# Altium PCB Prototype_PCB.PcbDoc
Units mm, origin at the board's own origin, x right, y up, seen from the top; angles counter-clockwise.
Board outline 100 x 90 mm, 2 copper layers (Top Layer, Bottom Layer); 79 components, 84 nets, 319 pads, 80 vias.
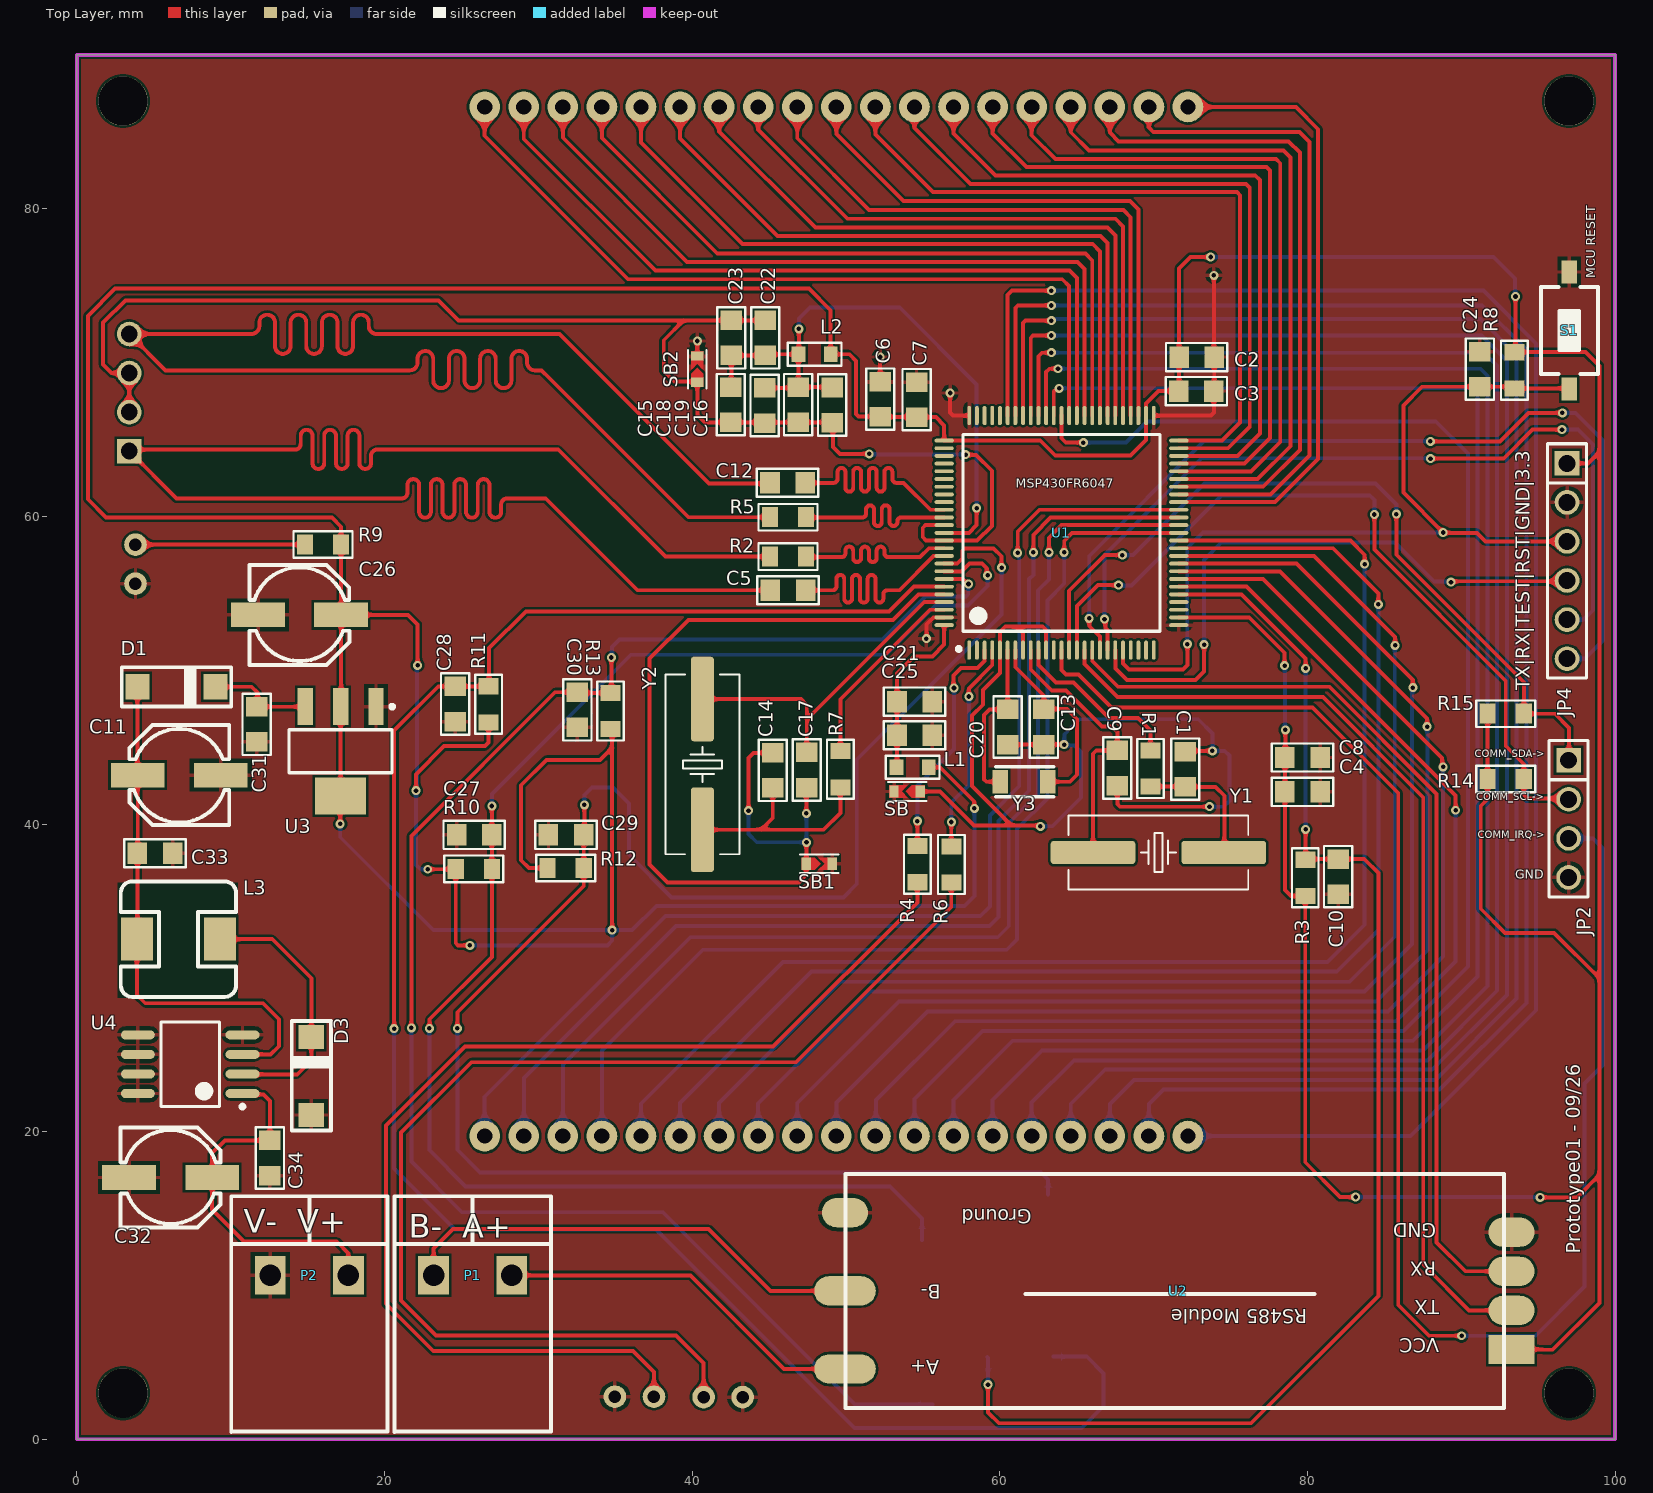
[diagram p0: Top Layer view]
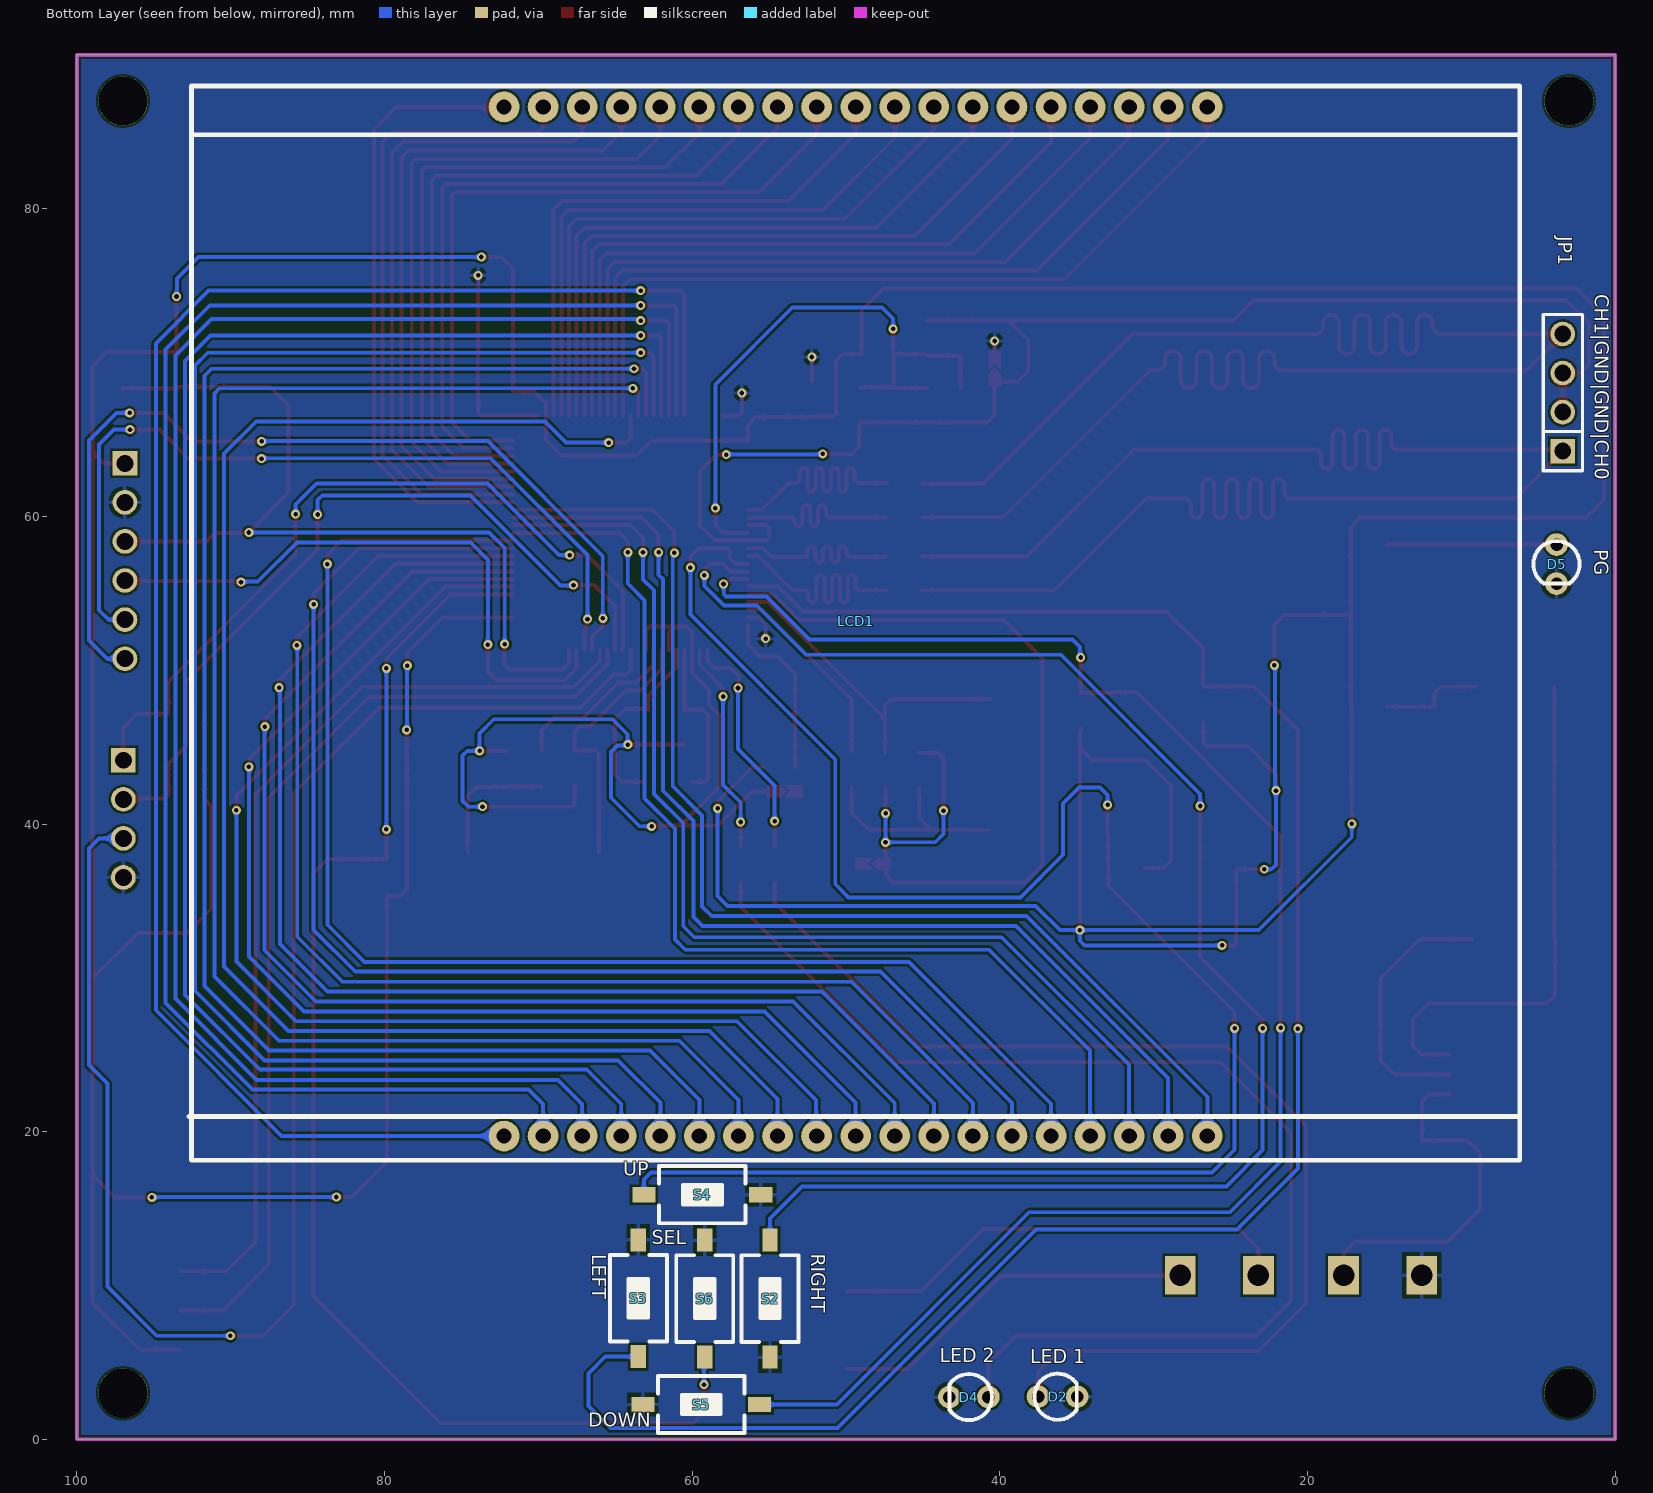
[diagram p1: Bottom Layer view, seen from below]

## Layer stack, top to bottom
Top Solder: solder mask 0.0102, Solder Resist, Dk 3.5
Top Layer: signal copper 0.0356
Dielectric 1: dielectric 0.32, FR-4, Dk 4.8
Bottom Layer: signal copper 0.0356
Bottom Solder: solder mask 0.0102, Solder Resist, Dk 3.5

## Board outline
0,0 0,90 100,90 100,0

## Design rules (kind name [scope] priority, off if disabled: settings)
Clearance [All] p1: gap=0.152 ignorepadtopadclearanceinfootprint=FALSE
MatchedLengths ch_out_2 [InNetClass('CH_OUT_2')] p1: tolerance=0.254 checknetsindiffpair=TRUE checkdiffpairvsdiffpair=FALSE checkxsignals=FALSE checkothers=FALSE
MatchedLengths ch_out [InNetClass('CH_OUT')] p2: tolerance=0.254 checknetsindiffpair=TRUE checkdiffpairvsdiffpair=FALSE checkxsignals=FALSE checkothers=FALSE
MatchedLengths ch_in [InNetClass('CH_IN')] p3: tolerance=0.254 checknetsindiffpair=TRUE checkdiffpairvsdiffpair=FALSE checkxsignals=FALSE checkothers=FALSE
PolygonConnect [All] p1: connectstyle=Relief reliefconductorwidth=0.254 reliefentries=4 polygonreliefangle="90 Angle" airgapwidth=0.254
RoutingVias [All] p1: holewidth=0.3 width=0.8 viastyle="Through Hole" minholewidth=0.3 minwidth=0.584 maxholewidth=0.5 maxwidth=1
SolderMaskExpansion [All] p1: expansion=0.102 istentingtop=FALSE
Width [All] p1: maxlimit=2.54 minlimit=0.203 preferedwidth=0.254
30 further rules are at their usual default settings.

## Components (designator, comment, footprint, x,y, rotation, side; value= is the part's Value field where it differs from the comment)
C1 "12p" SM-0805 72.06,43.561 r270 top
C2 "106" SM-0805 72.796,70.358 r0 top
C3 "106" SM-0805 72.771,68.148 r0 top
C4 "106" SM-0805 79.68,42.088 r0 top
C5 "102" SM-0805 46.228,55.194 r180 top
C6 "104" SM-0805 52.222,67.615 r270 top
C7 "104" SM-0805 54.585,67.589 r270 top
C8 "104" SM-0805 79.68,44.323 r180 top
C9 "12p" SM-0805 67.64,43.637 r90 top
C10 "104" SM-0805 81.991,36.576 r90 top
C11 "220uF/ 16V" "CAP SMD ALUMINUM D8" 6.655,43.18 r270 top
C12 "102" SM-0805 46.203,62.179 r180 top
C13 "12p" SM-0805 62.865,46.304 r90 top
C14 "12pF" SM-0805 45.237,43.485 r270 top
C15 "106" SM-0805 42.502,67.257 r270 top
C16 "106" SM-0805 49.098,67.234 r90 top
C17 "12pF" SM-0805 47.447,43.51 r90 top
C18 "106" SM-0805 44.704,67.208 r270 top
C19 "106" SM-0805 46.888,67.259 r90 top
C20 "12p" SM-0805 60.503,46.304 r90 top
C21 "106" SM-0805 54.458,47.955 r0 top
C22 "102" SM-0805 44.755,71.603 r270 top
C23 "102" SM-0805 42.545,71.603 r90 top
C24 "102" SM-0805 91.211,69.571 r270 top
C25 "104" SM-0805 54.458,45.771 r180 top
C26 "220uF/ 16V" "CAP SMD ALUMINUM D8" 14.478,53.594 r90 top
C27 "104" SM-0805 25.832,39.294 r0 top
C28 "104" SM-0805 24.587,47.803 r90 top
C29 "104" SM-0805 31.801,39.294 r0 top
C30 "104" SM-0805 32.537,47.422 r90 top
C31 "106" SM-0805 11.684,46.482 r90 top
C32 "100uF/ 35V" "CAP SMD ALUMINUM D8" 6.096,17.018 r90 top
C33 "104" SM-0805 5.08,38.1 r0 top
C34 "100nF" SM-0805 12.548,18.288 r90 top
D1 "M7" DO-214AC 6.477,48.92 r0 top
D2 "LED" "LED-3MM GRE" 36.246,2.769 r180 bottom value="LED 3 ly Single Colour"
D3 "SS210" DO-214AC 15.24,23.622 r90 top
D4 "LED" "LED-3MM GRE" 42.012,2.743 r0 bottom value="LED 3 ly Single Colour"
D5 "LED" "LED-3MM RED" 3.81,56.896 r270 bottom value="LED 3 ly Single Colour"
JP1 "JP 1x4 2.54" "JP 1x4 DT" 3.404,64.237 r90 bottom
JP2 "JP 1x4 2.54" "JP 1x4 DT" 96.977,44.145 r270 top
JP4 "JP 1x6 2.54" "JP 1x6 DT" 96.876,63.449 r270 top
L1 "600R" "WE-CBF_0805_High Speed" 54.331,43.688 r0 top value=11Ω
L2 "600R" "WE-CBF_0805_High Speed" 47.955,70.536 r180 top value=11Ω
L3 "100uH" "INDUCTOR SMD 7342 7.3X7.3X4.2mm" 6.604,32.512 r180 top value="150 mH"
LCD1 "LCD_TH1622" LCD_HT1622 49.371,45.434 r0 bottom
P1 "CON 2 EDG5.08" "CON 2 2EDG5.08" 28.27,10.668 r180 top
P2 "CON 2 EDG5.08" "CON 2 2EDG5.08" 17.653,10.668 r180 top
R1 "22R" "RESISTOR SMD 0805" 69.799,43.612 r270 top
R2 "200R" "RESISTOR SMD 0805" 46.228,57.379 r0 top
R3 "10k" "RESISTOR SMD 0805" 79.858,36.5 r270 top
R4 "1K" "RESISTOR SMD 0805" 54.635,37.389 r90 top
R5 "200R" "RESISTOR SMD 0805" 46.228,59.944 r0 top
R6 "1K" "RESISTOR SMD 0805" 56.845,37.363 r90 top
R7 "22R" "RESISTOR SMD 0805" 49.632,43.561 r270 top
R8 "47K" "RESISTOR SMD 0805" 93.447,69.494 r90 top
R9 "1k" "RESISTOR SMD 0805" 16.002,58.166 r180 top
R10 "10k" "RESISTOR SMD 0805" 25.806,37.084 r180 top
R11 "10k" "RESISTOR SMD 0805" 26.772,47.777 r270 top
R12 "10k" "RESISTOR SMD 0805" 31.775,37.135 r180 top
R13 "10k" "RESISTOR SMD 0805" 34.696,47.346 r270 top
R14 "4.7k" "RESISTOR SMD 0805" 92.888,42.926 r0 top
R15 "4.7k" "RESISTOR SMD 0805" 92.888,47.168 r0 top
S1 "SW" "BUTTON-SMD 2PIN" 97.028,72.085 r90 top
S2 "SW" "BUTTON-SMD 2PIN" 54.94,9.144 r270 bottom
S3 "SW" "BUTTON-SMD 2PIN" 63.5,9.169 r90 bottom
S4 "SW" "BUTTON-SMD 2PIN" 59.344,15.9 r180 bottom
S5 "SW" "BUTTON-SMD 2PIN" 59.411,2.261 r0 bottom
S6 "SW" "BUTTON-SMD 2PIN" 59.182,9.144 r90 bottom
SB "Bridge Line" "SB 0603" 53.924,42.113 r180 top
SB1 "Bridge Line" "SB 0603" 48.311,37.414 r0 top
SB2 "Bridge Line" "SB 0603" 40.335,69.621 r90 top
U1 "MSP430FR6047IPZR" *PZ0100A_L 64.008,58.928 r90 top
U2 "RS485 Module" "RS485_MODULE SMD" 71.323,9.627 r180 top
U3 "LM1117-3.3V" SOT223-4N 17.145,44.729 r270 top
U4 "XL1509" SOP8 7.366,24.384 r180 top
Y1 "8Mhz" "Thach Anh 2 chan SMD" 70.307,38.151 r0 top value=4Mhz
Y2 "8Mhz" "Thach Anh 2 chan SMD" 40.665,43.874 r270 top value=4Mhz
Y3 "32.768" "THACH ANH DAN 3215" 61.62,42.748 r0 top

## Footprints (in the part's own frame and the unit in brackets; to place one, negate y for a bottom-side part, rotate by r counter-clockwise, add the part's x,y. Pads: shape width x height; smd on the part's side, far side on the other; paste and mask are expansions set on the pad)
*PZ0100A_L [mm]
  oval 1.25x0.25 smd: 1(-7.625,6) 2(-7.625,5.5) 3(-7.625,5) 4(-7.625,4.5) 5(-7.625,4) 6(-7.625,3.5) 7(-7.625,3) 8(-7.625,2.5) 9(-7.625,2) 10(-7.625,1.5) 11(-7.625,1) 12(-7.625,0.5) 13(-7.625,0) 14(-7.625,-0.5) 15(-7.625,-1) 16(-7.625,-1.5) 17(-7.625,-2) 18(-7.625,-2.5) 19(-7.625,-3) 20(-7.625,-3.5) 21(-7.625,-4) 22(-7.625,-4.5) 23(-7.625,-5) 24(-7.625,-5.5) 25(-7.625,-6) 51(7.625,-6) 52(7.625,-5.5) 53(7.625,-5) 54(7.625,-4.5) 55(7.625,-4) 56(7.625,-3.5) 57(7.625,-3) 58(7.625,-2.5) 59(7.625,-2) 60(7.625,-1.5) 61(7.625,-1) 62(7.625,-0.5) 63(7.625,0) 64(7.625,0.5) 65(7.625,1) 66(7.625,1.5) 67(7.625,2) 68(7.625,2.5) 69(7.625,3) 70(7.625,3.5) 71(7.625,4) 72(7.625,4.5) 73(7.625,5) 74(7.625,5.5) 75(7.625,6)
  oval 0.25x1.25 smd: 26(-6,-7.625) 27(-5.5,-7.625) 28(-5,-7.625) 29(-4.5,-7.625) 30(-4,-7.625) 31(-3.5,-7.625) 32(-3,-7.625) 33(-2.5,-7.625) 34(-2,-7.625) 35(-1.5,-7.625) 36(-1,-7.625) 37(-0.5,-7.625) 38(0,-7.625) 39(0.5,-7.625) 40(1,-7.625) 41(1.5,-7.625) 42(2,-7.625) 43(2.5,-7.625) 44(3,-7.625) 45(3.5,-7.625) 46(4,-7.625) 47(4.5,-7.625) 48(5,-7.625) 49(5.5,-7.625) 50(6,-7.625) 76(6,7.625) 77(5.5,7.625) 78(5,7.625) 79(4.5,7.625) 80(4,7.625) 81(3.5,7.625) 82(3,7.625) 83(2.5,7.625) 84(2,7.625) 85(1.5,7.625) 86(1,7.625) 87(0.5,7.625) 88(0,7.625) 89(-0.5,7.625) 90(-1,7.625) 91(-1.5,7.625) 92(-2,7.625) 93(-2.5,7.625) 94(-3,7.625) 95(-3.5,7.625) 96(-4,7.625) 97(-4.5,7.625) 98(-5,7.625) 99(-5.5,7.625) 100(-6,7.625)
  silkscreen extent -7.67,-6.4 6.4,6.81, body extent -8,-8 8,8, height 1.6
"BUTTON-SMD 2PIN" [mm] "Switch SMD type"
  rect 1.5x1 smd: 1(-3.8,0) 2(3.8,0)
  silkscreen extent -2.82,-1.85 2.82,1.85, body extent -3.05,-1.85 3.05,1.85, height 2.5
"CAP SMD ALUMINUM D8" [mm] "SMT Aluminum Electrolytic Capacitors, Dimensions 6.3x7.7(DxL)"
  rect 1.6x3.5 smd: 1(0,-2.7) 2(0,2.7)
  silkscreen extent -3.25,-3.25 3.25,3.25, body extent -3.34,-3.52 3.26,3.48, height 7.7
"CON 2 2EDG5.08" [mm]
  rect 2x2.5 hole 1.4: 1(0,0) 2(5.08,0)
  silkscreen extent -2.54,-2.03 7.62,10.21, body extent -2.5,-1.75 7.58,10.25, height 3.15
DO-214AC [mm]
  rect 1.55x1.65 smd: 1(-2.54,0) 2(2.54,0)
  silkscreen extent -3.56,-1.27 3.56,1.27, body extent -2.59,-1.29 2.61,1.31, height 2.4
"INDUCTOR SMD 7342 7.3X7.3X4.2mm" [mm] "Inductor 7342 Body 7.3x7.3X4.2mm, Pad 2.8x2.1mm"
  rect 2.1x2.8 smd: 1(-2.7,0) 2(2.7,0)
  silkscreen extent -3.75,-3.75 3.75,3.75, body extent -3.65,-3.65 3.65,3.65, height 4.8
"JP 1x4 DT" [mm] "4 pins, 1 row, straight, gold plating"
  rect 1.6x1.6 hole 1.1: 1(0,0)
  round 1.6 hole 1.1: 2(2.54,0) 3(5.08,0) 4(7.62,0)
  silkscreen extent -1.27,-1.27 8.89,1.27, body extent -1.27,-1.27 8.89,1.27, height 8.54
"JP 1x6 DT" [mm] "6 pins, 1 row, straight, gold plating"
  rect 1.6x1.6 hole 1.1: 1(0,0)
  round 1.6 hole 1.1: 2(2.54,0) 3(5.08,0) 4(7.62,0) 5(10.16,0) 6(12.7,0)
  silkscreen extent -1.27,-1.27 13.97,1.27, body extent -1.27,-1.27 13.97,1.27, height 8.54
LCD_HT1622 [mm] "LCD_HT1622"
  round 2 hole 1: 1(-22.86,-41.18) 2(-20.32,-41.18) 3(-17.78,-41.18) 4(-15.24,-41.18) 5(-12.7,-41.18) 6(-10.16,-41.18) 7(-7.62,-41.18) 8(-5.08,-41.18) 9(-2.54,-41.18) 10(0,-41.18) 11(2.54,-41.18) 12(5.08,-41.18) 13(7.62,-41.18) 14(10.16,-41.18) 15(12.7,-41.18) 16(15.24,-41.18) 17(17.78,-41.18) 18(20.32,-41.18) 19(22.86,-41.18) 20(-22.86,25.718) 21(-20.32,25.718) 22(-17.78,25.718) 23(-15.24,25.718) 24(-12.7,25.718) 25(-10.16,25.718) 26(-7.62,25.718) 27(-5.08,25.718) 28(-2.54,25.718) 29(0,25.718) 30(2.54,25.718) 31(5.08,25.718) 32(7.62,25.718) 33(10.16,25.718) 34(12.7,25.718) 35(15.24,25.718) 36(17.78,25.718) 37(20.32,25.718) 38(22.86,25.718)
  silkscreen extent -43.18,-42.55 43.34,27.31
"LED-3MM GRE" [mm]
  round 1.47 hole 0.813: 1(-1.27,0) 2(1.27,0)
  silkscreen extent -1.5,-1.5 1.25,1.5, body extent -1.73,-1.65 1.49,1.65, height 4.72
"LED-3MM RED" [mm]
  round 1.47 hole 0.813: 1(-1.27,0) 2(1.27,0)
  silkscreen extent -1.5,-1.5 1.25,1.5, body extent -1.71,-1.65 1.5,1.65, height 4.72
"RESISTOR SMD 0805" [mm]
  rect 1.05x1.3 smd: 1(-1.177,0) 2(1.177,0)
  Top Layer pour cut-out: -0.584,0.864 0.584,0.864 0.584,-0.864 -0.584,-0.864
  silkscreen extent -1.92,-0.86 1.92,0.86, body extent -1,-0.62 1,0.63, height 0.5
"RS485_MODULE SMD" [mil]
  rect 118.11x75 smd: 1(-864,149)
  oval 118.11x75 smd: 2(-864,49) 3(-864,-51) 4(-864,-151) 5(842,-201)
  oval 157.48x75 smd: 6(842,-1) 7(842,199)
  silkscreen extent -845,-300 841,298
"SB 0603" [mm]
  rect 0.6x0.8 smd: 1(-0.9,0) 2(0.8,0)
  Top Layer region: 1.1,0.4 -0.1,0.4 0.3,0 -0.1,-0.4 1.1,-0.4
  Top Layer region: -1.2,0.4 -0.35,0.4 0.05,0 -0.35,-0.4 -1.2,-0.4
  silkscreen extent -1.3,-0.61 1.19,0.61
SM-0805 [mil] "Compoment SMD 80x50mil"
  rect 50x55 smd: 1(-45,0) 2(45,0)
  Top Layer pour cut-out: -18,36 18,36 18,-36 -18,-36
  silkscreen extent -78,-36 78,36, body extent -40,-25 40,25, height 24
SOP8 [mm] "8-Pin Small Outline Package 1.27 mm Pitch, IPC Medium Density"
  oval 2.2x0.6 smd: 1(-3.4,1.905) 2(-3.4,0.635) 3(-3.4,-0.635) 4(-3.4,-1.905) 5(3.4,-1.905) 6(3.4,-0.635) 7(3.4,0.635) 8(3.4,1.905)
  silkscreen extent -3.52,-2.75 1.9,2.88, body extent -3.02,-2.51 3.02,2.51, height 1.6
SOT223-4N [mm] "SOT223, 4-Leads, Body 6.5x3.5mm, Pitch 2.3mm, Lead Span 7mm, IPC Medium Density"
  rect 2.4x1 smd: 1(-2.9,2.3) 2(-2.9,0) 3(-2.9,-2.3)
  rect 2.4x3.3 smd: 4(2.9,0)
  silkscreen extent -3.02,-3.35 1.4,3.48, body extent -3.39,-3.27 3.5,3.23, height 1.72
"Thach Anh 2 chan SMD" [mm] "SMD Crystal HC49/US-SM package"
  round 0.508 on Mech15: 0(0,0)
  rrect25% 5.5x1.5 smd: 1(-4.25,0) 2(4.25,0)
  silkscreen extent -5.84,-2.41 5.84,2.41, body extent -6.4,-2.41 6.4,2.42, height 4.29
"THACH ANH DAN 3215" [mm] "Thach Anh Dan 5.08mm"
  rect 1x1.5 smd: 1(-1.6,0) 2(1.5,0)
  silkscreen extent -1.9,-0.98 1.9,0.97, body extent -1.6,-0.75 1.6,0.75, height 0.8
"WE-CBF_0805_High Speed" [mm] "SMD EMI Suppression Ferrite  Bead, body 2.0mmx1.2mm"
  rect 0.9x1 smd: 1(-1.05,0) 2(1.05,0)
  silkscreen extent -1.75,-0.75 1.75,0.75, body extent -1,-0.6 1,0.6, height 0.93

## Part data
C1 C2 C3 C4 C5 C6 C7 C8 C9 C10 C12 C13 C14 C15 C16 C17 C18 C19 C20 C21 C22 C23 C24 C25 C27 C28 C29 C30 C31 C33 C34: library part Cap_Non-Polar
C11 C26 C32: library part Cap_Polar
D1: library part "Diode Standard", "Diode Standard", Part Number="LED 3 ly Single Colour"
D2 D4 D5: "LED Single"
D3: library part "Diode Schottky", "Diode Schottky", Part Number="LED 3 ly Single Colour"
JP1 JP2: library part "JP 1x4 2.54 Duc Thang", "Cắm", Chung_Loai=Cắm, Don_Vi=Con, Ma_Hang=MH000903, Ten_Linh_Kien="Jump Đơn Đực 2.54MM 1x40P Thẳng 11MM"
JP4: library part "JP 1x6 2.54 Duc Thang", "Cắm", Chung_Loai=Cắm, Don_Vi=Con, Ma_Hang=MH000903, Ten_Linh_Kien="Jump Đơn Đực 2.54MM 1x40P Thẳng 11MM"
L1 L2: library part "FERRITE BEAD", "WE-CBF SMD EMI Suppression Ferrite Bead, 0805, 11Ω", PartNumber=7427920, ComponentLink1Description=Manufacturer, ComponentLink1URL=http://www.we-online.de, ComponentLink2Description=Datasheet, ComponentLink2URL=http://katalog.we-online.de/pbs/datasheet/7427920.pdf, PublishedDate="Aug 2016", Publisher="Wurth Elektronik", Size=0805, Type="High Speed"
L3: library part "Inductor Iron", "Magnetic-Core Inductor"
LCD1: library part LCD_TH_1622, "segment"
P1 P2: "Cắm", Chung_Loai=Cắm, Don_Vi=Con, Ma_Hang=MH000759, Ten_Linh_Kien="CON 2 2EDG5.08-2P 5.08MM ( Xanh Cong)"
R1 R2 R3 R4 R5 R6 R7 R8 R9 R10 R11 R12 R13 R14 R15: library part Resistor
S1 S2 S3 S4 S5 S6: library part SW-Button, "Switch-Button", LatestRevisionDate=17-Jul-2002, LatestRevisionNote="Re-released for DXP Platform.", PackageReference=SPST-2, Published=24-Mar-1999, Publisher="Altium Limited"
SB SB1 SB2: "Bridge Line connect"
U1: "Mixed-Signal Microcontroller, PZ0100A (LQFP-100)", Alternate Manufacturer="Texas Instruments", Alternate PartNumber=MSP430FR6047IPZ, ComponentLink1Description="Datasheet Link", ComponentLink1URL=https://sps06.itg.ti.com/sites/KMS/crossdivteams/altium/docs/ComponentDatasheets/SLASEB7_MSP430FR6047_Int.pdf, CompType=IC, LatestRevisionDate=2016-11-30, Manufacturer="Texas Instruments", MountType=SMT, PackageDescription=LQFP-100, PackageReference=PZ0100A, PartNumber=MSP430FR6047IPZR, Publisher="Texas Instruments", SizeArea_mm2=256, SizeAreaWB_mm2=324, SizeX_mm=16, SizeY_mm=16, SizeZ_mm=1.6, SymbolCreator=Altium, SymbolVersion=2016-11-29, U/M=EA
U2: library part "RS484 Module", "Module"
U3: library part LM1117, "800mA Low-Dropout Linear Regulator", Creator="Nguyen Ba Bien", Website=http://group3i.net
U4: "IC power sop8"
Y1 Y2: library part "Thach Anh 2 chan SMD", "Crystal For all Crystal 2pin."
Y3: library part "Thach Anh SMD 3225", "C700805", Chung_Loai=Dán, Don_Vi=Con, Ma_Hang=MH001979, Ten_Linh_Kien="Thạch Anh 16Mhz SMD5032"

## Free pads (board coordinates)
  round 3.2 hole 3.2: 2(3,3) 2(3,87) 2(97,3) 2(97,87)

## Via types
v1: diameter 0.584, hole 0.3, Top Layer to Bottom Layer, 80 vias

## Nets (pads, with @x,y where several pads share a name; then routed paths per layer and width w, separated by ;. In a path a pad name is that pad's centre, name@x,y a point inside that pad or via, vN(x,y) a via of type N, cw(c..) or ccw(c..) an arc to the next point about the centre after c; other vN are vias at no path point)
+5V: C11.1 C33.1 D1.1 L3.2 U4.3 | length 34.3
  Top Layer w0.254: D1.1 3.937,43.198 C11.1 3.955,38.118 C33.1 3.937,32.545 L3.2 3.904,28.887 4.445,28.346 12.09,28.346 13.132,27.305 13.132,25.552 12.598,25.019 U4.3
A+: P1.1 U2.7 | length 24.2
  Top Layer w0.254: P1.1 28.278,10.66 39.886,10.66 45.974,4.572 U2.7
AVCC1: C21.1 C25.2 L1.1 U1.100 | length 11.2
  Top Layer w0.254: L1.1 53.315,43.722 C25.2 C21.1 53.315,49.784 54.432,50.902 55.626,50.902 56.383,51.659 U1.100
B-: P1.2 U2.6 | length 30.7
  Top Layer w0.254: P1.2 23.19,12.395 24.46,13.665 41.072,13.665 45.085,9.652 U2.6
BTN_DWN: C30.2 R13.1 S5.1 U1.94 | length 108.4
  Top Layer w0.254: v1(21.742,26.746) 21.742,39.218 31.09,48.565 C30.2 32.579,48.523 R13.1 34.747,48.574 v1(34.747,50.825) ; U1.94 57.546,55.928 57.874,55.601 v1(57.963,55.601)
  Bottom Layer w0.254: v1(21.742,26.746) 21.742,18.059 25.044,14.757 38.1,14.757 50.597,2.261 S5.1 ; v1(34.747,50.825) 34.785,50.863 34.785,51.498 35.281,51.994 52.375,51.994 55.169,54.788 57.801,54.788 57.95,54.937 57.95,55.588 v1(57.963,55.601)
BTN_LEFT: C28.2 R11.1 S3.1 U1.95 | length 129.1
  Top Layer w0.254: v1(20.625,26.695) 20.625,46.076 23.495,48.946 C28.2 26.763,48.946 R11.1 ; R11.1@26.797,48.955 26.797,51.435 29.185,53.823 52.807,53.823 54.414,55.43 56.381,55.43 U1.95
  Bottom Layer w0.254: v1(20.625,26.695) 20.625,17.596 24.581,13.64 37.637,13.64 50.54,0.737 65.329,0.737 66.751,2.159 66.751,4.267 65.649,5.369 S3.1
BTN_RIGHT: C27.2 R10.1 S2.1 U1.93 | length 102.3
  Top Layer w0.254: v1(22.911,26.721) 22.936,26.746 22.936,27.305 26.984,31.353 R10.1 26.975,37.093 C27.2 v1(26.975,41.173) ; U1.93 57.52,56.428 58.039,56.947 58.852,56.947 59.144,56.654 59.144,56.223 v1(59.207,56.159)
  Bottom Layer w0.254: v1(22.911,26.721) 22.911,18.796 25.273,16.434 52.857,16.434 54.94,14.351 S2.1 ; v1(26.975,41.173) 26.975,41.961 36.017,51.003 52.603,51.003 55.804,54.204 57.937,54.204 59.207,55.474 v1(59.207,56.159)
BTN_SEL: C10.2 R3.1 S6.1 U1.30 | length 88.4
  Top Layer w0.254: v1(59.233,3.556) 59.233,1.753 59.944,1.041 76.327,1.041 84.607,9.322 84.607,36.805 83.693,37.719 C10.2 79.899,37.719 R3.1@79.883,37.703 ; U1.30 75.721,54.928 79.883,50.766 v1(79.883,50.114) ; R3.1 R3.1@79.883,37.703 ; v1(79.883,39.649) R3.1@79.883,37.703
  Bottom Layer w0.254: S6.1 59.233,5.293 v1(59.233,3.556) ; v1(79.883,39.649) v1(79.883,50.114)
BTN_UP: C29.2 R12.1 S4.1 U1.92 | length 119.7
  Top Layer w0.254: v1(24.74,26.721) 24.74,27.762 32.953,35.975 R12.1 32.953,39.285 32.995,39.327 v1(32.995,41.25) ; U1.92 56.385,56.93 57.235,56.93 57.556,57.252 57.556,57.763 57.705,57.912 59.588,57.912 60.096,57.404 60.096,56.693 v1(60.122,56.667)
  Bottom Layer w0.254: v1(24.74,26.721) 24.74,18.821 26.213,17.348 62.687,17.348 63.144,16.891 S4.1 ; v1(32.995,41.25) 32.995,41.885 33.477,42.367 34.849,42.367 35.89,41.326 35.89,37.998 38.659,35.23 49.835,35.23 50.698,36.093 50.698,44.196 60.122,53.619 v1(60.122,56.667)
CH0_IN: C5.1 U1.91 | length 19.2
  Top Layer w0.254: C5.1 48.997,55.194 49.124,55.194 ccw(c49.124,55.448) 49.378,55.448 49.378,55.939 cw(c49.632,55.939) 49.886,55.939 49.886,54.649 ccw(c50.14,54.649) 50.394,54.649 50.394,55.939 cw(c50.648,55.939) 50.902,55.939 50.902,54.649 ccw(c51.156,54.649) 51.41,54.649 51.41,55.939 cw(c51.664,55.939) 51.918,55.939 51.918,54.649 ccw(c52.172,54.649) 52.426,54.649 52.426,54.94 cw(c52.68,54.94) 52.68,55.194 53.465,55.194 53.467,55.194 55.701,57.428 U1.91
CH0_OUT: R2.2 U1.90 | length 13.3
  Top Layer w0.254: R2.2 47.431,57.353 49.581,57.353 49.708,57.353 ccw(c49.708,57.607) 49.962,57.607 49.962,57.776 cw(c50.216,57.776) 50.47,57.776 50.47,57.286 ccw(c50.724,57.286) 50.978,57.286 50.978,57.776 cw(c51.232,57.776) 51.486,57.776 51.486,57.286 ccw(c51.74,57.286) 51.994,57.286 51.994,57.776 cw(c52.248,57.776) 52.502,57.776 52.502,57.607 ccw(c52.756,57.607) 52.756,57.353 54.035,57.353 54.813,57.353 55.388,57.928 U1.90
CH1_IN: C12.1 U1.85 | length 19.2
  Top Layer w0.254: C12.1 49.073,62.179 49.2,62.179 ccw(c49.2,62.433) 49.454,62.433 49.454,62.893 cw(c49.708,62.893) 49.962,62.893 49.962,61.858 ccw(c50.216,61.858) 50.47,61.858 50.47,62.893 cw(c50.724,62.893) 50.978,62.893 50.978,61.858 ccw(c51.232,61.858) 51.486,61.858 51.486,62.893 cw(c51.74,62.893) 51.994,62.893 51.994,61.858 ccw(c52.248,61.858) 52.502,61.858 52.502,62.893 cw(c52.756,62.893) 53.01,62.893 53.01,62.433 ccw(c53.264,62.433) 53.264,62.179 53.674,62.179 53.746,62.179 55.499,60.427 56.382,60.427 U1.85
CH1_OUT: R5.2 U1.86 | length 13.3
  Top Layer w0.254: R5.2 47.421,59.928 50.927,59.928 51.054,59.928 ccw(c51.054,60.182) 51.308,60.182 51.308,60.461 cw(c51.562,60.461) 51.816,60.461 51.816,59.629 ccw(c52.07,59.629) 52.324,59.629 52.324,60.461 cw(c52.578,60.461) 52.832,60.461 52.832,59.629 ccw(c53.086,59.629) 53.34,59.629 53.34,59.674 cw(c53.594,59.674) 53.594,59.928 54.166,59.928 U1.86
COMM_IRQ: JP2.3 U1.13 | length 105.5
  Top Layer w0.254: U1.13 64.008,50.013 64.313,49.708 65.126,49.708 67.259,47.574 80.34,47.574 85.903,42.012 85.903,8.738 87.909,6.731 v1(90.018,6.731)
  Bottom Layer w0.254: v1(90.018,6.731) 94.818,6.731 98.019,9.931 98.019,23.127 99.212,24.321 99.212,38.405 98.552,39.065 JP2.3
COMM_SCL: JP2.2 R14.2 U1.15 | length 51.6
  Top Layer w0.254: U1.15 65.008,54.162 66.37,55.524 v1(67.716,55.524) ; v1(84.353,60.122) 84.353,57.836 92.888,49.301 92.888,45.06 94.065,43.882 R14.2 94.065,41.876 94.285,41.656 96.926,41.656 JP2.2
  Bottom Layer w0.254: v1(67.716,55.524) 67.742,55.499 68.555,55.499 74.422,61.366 84.049,61.366 84.353,61.062 v1(84.353,60.122)
COMM_SDA: JP2.1 R15.2 U1.14 | length 51.1
  Top Layer w0.254: U1.14 64.508,55.161 66.827,57.48 v1(67.97,57.48) ; v1(85.776,60.147) 85.776,57.506 94.065,49.216 R15.2 96.088,47.168 97.003,46.253 97.003,44.171 JP2.1
  Bottom Layer w0.254: v1(67.97,57.48) 68.656,57.48 73.304,62.128 84.43,62.128 85.776,60.782 v1(85.776,60.147)
DVCC1: C2.1 C3.1 C4.1 C6.2 C7.2 C8.2 C26.1 JP4.1 L1.2 L2.1 R3.2 R8.2 R9.1 R10.2 R11.2 R12.2 R13.2 R14.1 R15.1 U1.27 U1.52 U1.76 U2.1 U3.2 U3.4 | length 458.8
  Top Layer w0.254: v1(17.12,40.005) 17.12,41.804 U3.4 U3.2 17.178,47.662 C26.1 ; v1(22.047,42.164) 22.047,43.231 23.876,45.06 26.543,45.06 26.772,45.288 R11.2 ; v1(22.149,50.317) 22.149,52.959 21.514,53.594 C26.1 ; v1(22.809,37.059) 24.604,37.059 R10.2 24.629,32.254 24.778,32.106 v1(25.552,32.106) ; R12.2 29.388,37.135 28.88,37.643 28.88,42.52 30.531,44.171 34.011,44.171 34.798,44.958 ; R13.2 34.798,46.067 34.798,44.958 ; v1(34.798,33.096) 34.798,44.958 ; L1.2 56.109,43.688 58.338,41.459 58.338,41.027 v1(58.344,41.021) ; U1.27 76.214,53.428 78.507,51.135 78.507,50.296 v1(78.511,50.292) ; v1(73.711,76.86) 72.39,76.86 71.653,76.124 C2.1 71.653,68.174 C3.1 70.307,68.148 69.508,67.349 U1.52 69.508,64.961 68.504,63.957 63.602,63.957 62.631,64.928 U1.76 56.383,65.918 55.855,66.446 C7.2 54.559,66.472 C6.2 52.197,66.497 50.8,66.497 50.648,66.65 50.648,70.104 50.216,70.536 L2.1 49.005,73.397 47.6,74.803 2.489,74.803 0.711,73.025 0.711,61.112 1.905,59.919 16.586,59.919 17.179,59.325 R9.1 17.179,53.595 C26.1 ; v1(78.562,46.126) 78.562,44.348 C8.2 C4.1 78.537,35.712 78.927,35.322 R3.2 79.858,18.009 82.118,15.748 82.922,15.748 82.933,15.737 83.123,15.737 v1(83.134,15.748) ; R15.1 R14.1 91.71,41.622 91.262,41.173 91.262,34.493 92.837,32.918 96.037,32.918 98.984,29.972 ; U2.1 95.28,5.842 95.302,5.82 95.939,5.82 98.984,8.865 98.984,17.196 ; v1(93.523,74.295) 93.523,70.748 R8.2 98.086,70.672 98.984,69.774 98.984,64.186 ; v1(95.123,15.723) 97.511,15.723 98.984,17.196 ; JP4.1 98.247,63.449 98.984,64.186 ; 98.984,17.196 98.984,29.972 ; 98.984,29.972 98.984,64.186
  Bottom Layer w0.254: v1(17.12,40.005) 17.12,39.141 23.165,33.096 v1(34.798,33.096) ; v1(22.149,50.317) 22.098,50.267 22.098,42.215 v1(22.047,42.164) 22.047,37.338 22.327,37.059 v1(22.809,37.059) ; v1(25.552,32.106) 34.493,32.106 34.798,32.41 v1(34.798,33.096) ; v1(58.344,41.021) 58.344,35.306 57.709,34.671 37.668,34.671 36.093,33.096 v1(34.798,33.096) ; v1(73.711,76.86) 92.1,76.86 93.497,75.463 93.497,74.32 v1(93.523,74.295) ; v1(78.511,50.292) 78.537,50.267 78.537,46.152 v1(78.562,46.126) ; v1(83.134,15.748) 95.098,15.748 v1(95.123,15.723)
HFXIN: C9.2 U1.9 Y1.1 | length 17.9
  Top Layer w0.254: U1.9 62.008,50.031 63.373,48.666 64.313,48.666 66.65,46.33 67.285,46.33 67.64,45.974 C9.2 66.269,44.78 66.057,44.569 Y1.1
HFXOUT: R1.1 U1.10 | length 11.3
  Top Layer w0.254: U1.10 62.508,50.344 63.652,49.2 64.795,49.2 67.107,46.888 68.986,46.888 69.799,46.076 R1.1
JTAG_RST: C24.2 JP4.3 R8.1 S1.1 U1.21 | length 59
  Top Layer w0.254: U1.21 68.008,50.432 68.402,50.038 71.907,50.038 72.2,50.33 72.2,51.676 v1(72.187,51.689) ; JP4.3 91.567,58.369 91.008,58.928 88.849,58.928 v1(88.824,58.953) 86.233,61.544 86.233,67.208 87.452,68.428 C24.2 93.336,68.428 R8.1 96.996,68.317 S1.1
  Bottom Layer w0.254: v1(72.187,51.689) 72.187,57.937 73.203,58.953 v1(88.824,58.953)
JTAG_RX: JP4.5 U1.19 | length 54.5
  Top Layer w0.254: v1(66.802,53.315) 66.865,53.251 66.865,52.743 67.008,52.601 U1.19 ; v1(88.001,63.754) 92.761,63.754 94.64,65.634 v1(96.545,65.634)
  Bottom Layer w0.254: v1(66.802,53.315) 66.802,57.48 73.101,63.779 87.975,63.779 v1(88.001,63.754) ; v1(96.545,65.634) 97.587,65.634 98.552,64.668 98.552,53.899 97.942,53.289 JP4.5
JTAG_TEST: JP4.4 U1.20 | length 39.9
  Top Layer w0.254: U1.20 67.508,50.119 68.275,49.352 72.72,49.352 73.279,49.911 v1(73.279,51.664) ; v1@89.319,55.778 96.825,55.778 JP4.4
  Bottom Layer w0.254: v1(73.279,51.664) 73.279,57.175 74.397,58.293 85.7,58.293 88.24,55.753 89.306,55.753 v1(89.332,55.728)
JTAG_TX: JP4.6 U1.18 | length 60.3
  Top Layer w0.254: v1(65.811,53.365) 65.811,52.883 66.508,52.186 U1.18 ; v1(87.986,64.872) 92.507,64.872 94.361,66.726 v1(96.571,66.726)
  Bottom Layer w0.254: v1(65.811,53.365) 65.811,57.429 73.279,64.897 87.96,64.897 v1(87.986,64.872) ; v1(96.571,66.726) 97.434,66.726 99.217,64.944 99.217,51.922 98.044,50.749 JP4.6
LCD0: LCD1.1 U1.62 | length 52.3
  Top Layer w0.254: LCD1.1 26.511,84.741 35.839,75.413 64.059,75.413 64.508,74.963 U1.62
LCD1: LCD1.2 U1.61 | length 50.7
  Top Layer w0.254: LCD1.2 29.051,84.538 37.617,75.971 64.541,75.971 65.008,75.505 U1.61
LCD2: LCD1.3 U1.60 | length 49
  Top Layer w0.254: LCD1.3 31.591,84.614 39.675,76.53 65.049,76.53 65.508,76.072 U1.60
LCD3: LCD1.4 U1.59 | length 47.3
  Top Layer w0.254: LCD1.4 34.131,84.588 41.631,77.089 65.557,77.089 66.008,76.638 U1.59
LCD4: LCD1.5 U1.58 | length 45.8
  Top Layer w0.254: LCD1.5 36.671,84.309 43.282,77.699 66.04,77.699 66.508,77.231 U1.58
LCD5: LCD1.6 U1.57 | length 43.9
  Top Layer w0.254: LCD1.6 39.211,84.563 45.542,78.232 66.548,78.232 67.008,77.772 U1.57
LCD6: LCD1.7 U1.56 | length 41.9
  Top Layer w0.254: LCD1.7 41.751,85.018 48.004,78.765 67.005,78.765 67.508,78.263 U1.56
LCD7: LCD1.8 U1.55 | length 40.1
  Top Layer w0.254: LCD1.8 44.291,85.15 50.092,79.35 67.513,79.35 68.008,78.855 U1.55
LCD8: LCD1.9 U1.54 | length 38.7
  Top Layer w0.254: LCD1.9 46.831,84.578 51.501,79.908 68.047,79.908 68.508,79.447 U1.54
LCD9: LCD1.10 U1.53 | length 36.8
  Top Layer w0.254: LCD1.10 49.371,84.868 53.746,80.493 68.453,80.493 69.008,79.938 U1.53
LCD10: LCD1.11 U1.50 | length 46.4
  Top Layer w0.254: LCD1.11 51.911,84.817 55.651,81.077 75.413,81.077 75.616,80.874 75.616,66.091 74.453,64.928 U1.50
LCD11: LCD1.12 U1.49 | length 45.5
  Top Layer w0.254: LCD1.12 54.451,85.249 58.09,81.61 75.997,81.61 76.251,81.356 76.251,65.837 74.842,64.428 U1.49
LCD12: LCD1.13 U1.48 | length 45.3
  Top Layer w0.254: LCD1.13 56.991,84.893 59.715,82.169 76.606,82.169 76.911,81.864 76.911,65.38 75.46,63.928 U1.48
LCD13: LCD1.14 U1.47 | length 44.8
  Top Layer w0.254: LCD1.14 59.531,84.893 61.722,82.702 77.343,82.702 77.572,82.474 77.572,65.106 75.894,63.428 U1.47
LCD14: LCD1.15 U1.46 | length 44.3
  Top Layer w0.254: LCD1.15 62.071,84.777 63.612,83.236 77.953,83.236 78.232,82.956 78.232,64.833 76.327,62.928 U1.46
LCD15: LCD1.16 U1.45 | length 43.5
  Top Layer w0.254: LCD1.16 64.611,84.969 65.786,83.795 78.435,83.795 78.892,83.337 78.892,64.559 76.761,62.428 U1.45
LCD16: LCD1.17 U1.44 | length 42.7
  Top Layer w0.254: LCD1.17 67.151,84.944 67.716,84.379 78.765,84.379 79.502,83.642 79.502,64.306 77.124,61.928 U1.44
LCD17: LCD1.18 U1.43 | length 42.1
  Top Layer w0.254: LCD1.18 69.691,85.274 69.977,84.988 79.477,84.988 80.137,84.328 80.137,63.957 77.608,61.428 U1.43
LCD18: LCD1.19 U1.42 | length 40.7
  Top Layer w0.254: U1.42 77.898,60.928 80.696,63.726 80.696,85.166 79.248,86.614 LCD1.19
LCD19: LCD1.20 U1.41 | length 76.8
  Top Layer w0.254: v1(61.163,57.633) 61.163,59.004 62.587,60.428 U1.41
  Bottom Layer w0.254: LCD1.20 26.511,22.269 38.252,34.011 58.725,34.011 59.36,34.646 59.36,40.561 61.265,42.466 61.265,57.319 61.226,57.357 61.226,57.569 v1(61.163,57.633)
LCD20: LCD1.21 U1.40 | length 74.9
  Top Layer w0.254: v1(62.179,57.658) 62.179,58.801 63.306,59.928 U1.40
  Bottom Layer w0.254: LCD1.21@29.058,19.482 29.058,23.495 38.938,33.376 59.334,33.376 59.919,33.96 59.919,40.183 61.9,42.164 61.9,55.918 62.179,56.197 v1(62.179,57.658)
LCD21: LCD1.22 U1.39 | length 72.5
  Top Layer w0.254: v1(63.195,57.658) 63.195,58.61 64.014,59.428 U1.39
  Bottom Layer w0.254: LCD1.22 31.591,24.352 39.878,32.639 59.868,32.639 60.579,33.35 60.579,40.056 62.484,41.961 62.484,55.194 63.195,55.905 v1(63.195,57.658)
LCD22: LCD1.23 U1.38 | length 70.4
  Top Layer w0.254: v1(64.186,57.658) 64.186,58.409 64.704,58.928 U1.38
  Bottom Layer w0.254: LCD1.23 34.131,25.267 40.691,31.826 60.452,31.826 61.112,32.487 61.112,39.688 63.094,41.67 63.094,54.534 64.186,55.626 64.186,56.54 v1(64.186,57.658)
LCD23: LCD1.24 U1.37 | length 90.5
  Top Layer w0.254: U1.37 82.796,58.428 83.718,57.506 v1(83.718,56.896)
  Bottom Layer w0.254: LCD1.24 36.671,21.812 45.898,31.039 81.305,31.039 83.718,33.452 v1(83.718,56.896)
LCD24: LCD1.25 U1.36 | length 88.3
  Top Layer w0.254: U1.36 81.67,57.928 84.607,54.991 v1(84.607,54.28)
  Bottom Layer w0.254: LCD1.25 39.211,21.863 47.752,30.404 81.906,30.404 84.614,33.111 84.614,54.274 v1(84.607,54.28)
LCD25: LCD1.26 U1.35 | length 86.3
  Top Layer w0.254: U1.35 80.418,57.428 85.7,52.146 v1(85.7,51.613)
  Bottom Layer w0.254: LCD1.26 41.751,21.863 49.632,29.743 82.745,29.743 85.673,32.672 85.673,51.586 v1(85.7,51.613)
LCD26: LCD1.27 U1.34 | length 84.5
  Top Layer w0.254: U1.34 79.292,56.928 86.852,49.368 v1(86.852,48.865)
  Bottom Layer w0.254: LCD1.27 44.291,21.838 51.562,29.108 83.71,29.108 86.805,32.203 86.805,48.817 v1(86.852,48.865)
LCD27: LCD1.28 U1.33 | length 82.4
  Top Layer w0.254: U1.33 78.217,56.428 87.782,46.863 v1(87.782,46.33)
  Bottom Layer w0.254: LCD1.28 46.831,21.863 53.442,28.473 84.472,28.473 87.793,31.794 87.793,46.319 v1(87.782,46.33)
LCD28: LCD1.29 U1.32 | length 80.4
  Top Layer w0.254: U1.32 77.117,55.928 88.758,44.287 88.758,43.774 v1(88.821,43.711)
  Bottom Layer w0.254: LCD1.29 49.371,21.888 55.296,27.813 85.234,27.813 88.798,31.378 88.798,43.688 v1(88.821,43.711)
LCD29: LCD1.30 U1.31 | length 78.2
  Top Layer w0.254: U1.31 76.049,55.428 89.637,41.841 v1(89.637,40.894)
  Bottom Layer w0.254: LCD1.30 51.943,19.748 51.943,22.047 57.074,27.178 85.75,27.178 89.637,31.064 v1(89.637,40.894)
LCD_COM0: LCD1.31 U1.63 | length 104.7
  Top Layer w0.254: U1.63 64.008,65.075 64.287,64.795 v1(65.43,64.795)
  Bottom Layer w0.254: LCD1.31 54.451,22.117 58.877,26.543 86.233,26.543 90.424,30.734 90.424,64.084 88.341,66.167 69.571,66.167 68.199,64.795 v1(65.43,64.795)
LCD_COM1: LCD1.32 U1.64 | length 107
  Top Layer w0.254: U1.64 63.508,68.131 63.703,68.326 v1(63.856,68.326)
  Bottom Layer w0.254: LCD1.32 56.991,22.066 60.833,25.908 86.868,25.908 91.059,30.099 91.059,67.996 90.729,68.326 v1(63.856,68.326)
LCD_COM2: LCD1.33 U1.65 | length 109
  Top Layer w0.254: U1.65 63.008,69.383 63.221,69.596 v1(63.779,69.596)
  Bottom Layer w0.254: LCD1.33 59.531,22.066 62.738,25.273 87.503,25.273 91.694,29.464 91.694,69.139 91.237,69.596 v1(63.779,69.596)
LCD_COM3: LCD1.34 U1.66 | length 110.2
  Top Layer w0.254: U1.66 62.508,70.407 62.738,70.637 v1(63.348,70.637)
  Bottom Layer w0.254: LCD1.34 62.071,21.888 64.821,24.638 87.808,24.638 92.329,29.159 92.329,69.799 91.491,70.637 v1(63.348,70.637)
LCD_COM4: LCD1.35 U1.67 | length 111.3
  Top Layer w0.254: U1.67 62.008,71.606 62.157,71.755 v1(63.348,71.755)
  Bottom Layer w0.254: v1(63.348,71.755) 91.313,71.755 92.964,70.104 92.964,28.88 88.113,24.028 66.853,24.028 64.611,21.787 LCD1.35
LCD_COM5: LCD1.36 U1.68 | length 112.4
  Top Layer w0.254: U1.68 61.508,72.571 61.657,72.72 v1(63.348,72.72)
  Bottom Layer w0.254: v1(63.348,72.72) 63.411,72.783 63.623,72.783 63.661,72.822 91.237,72.822 93.599,70.46 93.599,28.651 88.316,23.368 68.732,23.368 67.151,21.787 LCD1.36
LCD_COM6: LCD1.37 U1.69 | length 113.3
  Top Layer w0.254: U1.69 61.008,73.556 61.163,73.711 v1(63.348,73.711)
  Bottom Layer w0.254: v1(63.348,73.711) 91.364,73.711 94.234,70.841 94.234,28.372 88.595,22.733 70.637,22.733 69.691,21.787 LCD1.37
LCD_COM7: LCD1.38 U1.70 | length 113.1
  Top Layer w0.254: U1.70 60.508,74.402 60.782,74.676 v1(63.348,74.676)
  Bottom Layer w0.254: v1(63.348,74.676) 91.44,74.676 94.869,71.247 94.869,27.889 86.696,19.717 LCD1.38
LED1: R4.2 U1.3 | length 15.2
  Top Layer w0.254: R4.2 v1(54.635,40.183) ; v1(57.023,48.844) 56.985,48.882 56.985,49.644 57.48,50.14 58.547,50.14 59.008,50.601 U1.3
  Bottom Layer w0.254: v1(54.635,40.183) 54.635,42.494 57.023,44.882 v1(57.023,48.844)
LED2: R6.2 U1.4 | length 13.9
  Top Layer w0.254: R6.2 v1(56.845,40.132) ; v1(57.988,48.285) 57.988,48.819 59.508,50.339 U1.4
  Bottom Layer w0.254: v1(56.845,40.132) 56.845,41.402 57.988,42.545 v1(57.988,48.285)
LFXIN: C20.2 U1.6 Y3.1 | length 10.8
  Top Layer w0.254: Y3.1 59.128,42.748 58.979,42.897 58.979,47.092 59.334,47.447 C20.2 60.508,47.452 U1.6
LFXOUT: C13.2 U1.7 Y3.2 | length 12.8
  Top Layer w0.254: U1.7 61.008,50.193 62.865,48.336 C13.2 62.89,47.473 64.364,47.473 65.024,46.812 65.024,43.202 64.57,42.748 Y3.2
NetC1_2: C1.2 R1.2 Y1.2 | length 8.8
  Top Layer w0.254: R1.2 72.043,42.434 C1.2 74.016,42.418 74.6,41.834 74.6,38.193 Y1.2
NetC5_2: C5.2 JP1.1 R2.1 | length 120.1
  Top Layer w0.254: R2.1 38.252,57.379 31.293,64.338 20.596,64.338 19.507,64.338 ccw(c19.507,63.957) 19.126,63.957 19.126,63.465 cw(c18.745,63.465) 18.364,63.465 18.364,65.249 ccw(c17.983,65.249) 17.602,65.249 17.602,63.465 cw(c17.221,63.465) 16.84,63.465 16.84,65.249 ccw(c16.459,65.249) 16.078,65.249 16.078,63.465 cw(c15.697,63.465) 15.316,63.465 15.316,65.249 ccw(c14.935,65.249) 14.554,65.249 14.554,64.719 cw(c14.173,64.719) 14.173,64.338 14.046,64.338 3.505,64.338 JP1.1 6.477,61.163 20.98,61.163 21.107,61.163 ccw(c21.107,61.544) 21.488,61.544 21.488,62.036 cw(c21.869,62.036) 22.25,62.036 22.25,60.29 ccw(c22.631,60.29) 23.012,60.29 23.012,62.036 cw(c23.393,62.036) 23.774,62.036 23.774,60.29 ccw(c24.155,60.29) 24.536,60.29 24.536,62.036 cw(c24.917,62.036) 25.298,62.036 25.298,60.29 ccw(c25.679,60.29) 26.06,60.29 26.06,62.036 cw(c26.441,62.036) 26.822,62.036 26.822,60.29 ccw(c27.203,60.29) 27.584,60.29 27.584,60.782 cw(c27.965,60.782) 27.965,61.163 29.03,61.163 30.48,61.163 36.449,55.194 C5.2
NetC12_2: C12.2 JP1.4 R5.1 | length 120.1
  Top Layer w0.254: R5.1 39.751,59.944 30.718,68.977 30.201,69.494 29.769,69.494 cw(c29.769,70.002) 29.261,70.002 29.261,70.24 ccw(c28.753,70.24) 28.245,70.24 28.245,68.842 cw(c27.737,68.842) 27.229,68.842 27.229,70.24 ccw(c26.721,70.24) 26.213,70.24 26.213,68.842 cw(c25.705,68.842) 25.197,68.842 25.197,70.24 ccw(c24.689,70.24) 24.181,70.24 24.181,68.842 cw(c23.673,68.842) 23.165,68.842 23.165,70.24 ccw(c22.657,70.24) 22.149,70.24 22.149,70.002 cw(c21.641,70.002) 21.641,69.494 21.514,69.494 5.766,69.494 JP1.4 11.227,71.857 11.354,71.857 ccw(c11.354,72.365) 11.862,72.365 11.862,72.603 cw(c12.37,72.603) 12.878,72.603 12.878,71.07 ccw(c13.386,71.07) 13.894,71.07 13.894,72.603 cw(c14.402,72.603) 14.91,72.603 14.91,71.07 ccw(c15.418,71.07) 15.926,71.07 15.926,72.603 cw(c16.434,72.603) 16.942,72.603 16.942,71.07 ccw(c17.45,71.07) 17.958,71.07 17.958,72.603 cw(c18.466,72.603) 18.974,72.603 18.974,72.365 ccw(c19.482,72.365) 19.482,71.857 20.323,71.857 31.369,71.857 41.097,62.128 45.009,62.128 C12.2
NetC14_2: C14.2 R7.2 Y2.2 | length 14.1
  Top Layer w0.254: Y2.2 44.475,39.624 ; C14.2 45.237,40.386 44.475,39.624 ; R7.2 49.632,40.716 48.539,39.624 44.475,39.624
NetC31_2: C31.2 D1.2 U3.3 | length 7
  Top Layer w0.254: D1.2 11.354,48.92 11.735,48.539 11.735,47.676 C31.2 U3.3@14.845,47.625
NetD2_1: D2.1 R4.1 | length 74.3
  Top Layer w0.254: D2.1 37.516,4.369 36.144,5.74 23.165,5.74 20.091,8.814 20.091,20.396 25.222,25.527 45.263,25.527 54.635,34.9 R4.1
NetD3_2: D3.2 L3.1 U4.2 | length 17.2
  Top Layer w0.254: L3.1 12.7,32.512 15.24,29.972 D3.2 15.24,24.638 14.326,23.724 10.791,23.724 U4.2
NetD4_1: D4.1 R6.1 | length 77.9
  Top Layer w0.254: D4.1 40.742,4.953 38.938,6.756 23.343,6.756 21.082,9.017 21.082,19.939 25.654,24.511 46.761,24.511 56.845,34.595 R6.1
NetD5_1: D5.1 R9.2 | length 11
  Top Layer w0.254: D5.1 R9.2
PVDD: C15.1 C16.2 C18.1 C19.2 C22.2 C23.1 L2.2 U1.88 | length 40.8
  Top Layer w0.254: C15.1 42.545,68.443 C23.1 C22.2 44.831,70.536 L2.2 ; C18.1 46.838,68.351 C19.2 ; v1(46.939,72.187) 46.939,70.57 L2.2 ; C16.2 49.073,68.402 C19.2 ; U1.88 57.988,58.928 58.496,59.436 v1(58.496,60.528) ; C19.2 46.905,68.419 L2.2
  Bottom Layer w0.254: v1(46.939,72.187) 46.939,72.873 47.65,73.584 53.492,73.584 58.496,68.58 v1(58.496,60.528)
PWR.IN: C32.1 C34.2 P2.1 U4.1 | length 23.8
  Top Layer w0.254: U4.1 10.832,22.413 12.131,22.413 12.548,21.996 C34.2 9.627,19.431 8.796,18.6 C32.1 8.796,14.928 10.871,12.852 16.891,12.852 17.653,12.09 P2.1
RS485_RXD: U1.17 U2.3 | length 61.5
  Top Layer w0.254: U1.17 66.01,51.301 66.01,50.601 67.691,48.92 81.432,48.92 88.392,41.961 88.392,12.802 90.272,10.922 U2.3
RS485_TXD: U1.16 U2.2 | length 63.9
  Top Layer w0.254: U1.16 65.508,50.392 67.64,48.26 81.001,48.26 87.528,41.732 87.528,11.354 90.5,8.382 U2.2
TARGET_GND: C2.2 C3.2 C4.2 C6.1 C7.1 C8.1 C10.1 C11.2 C21.2 C24.1 C25.1 C26.2 C27.1 C28.1 C29.1 C30.1 C31.1 C32.2 C33.2 C34.1 D2.2 D3.1 D4.2 D5.2 JP2.4 JP4.2 P2.2 S1.2 S2.2 S3.2 S4.2 S5.2 S6.2 SB1.2 SB2.2 SB.2 U1.26 U1.51 U1.75 U1.99 U2.4 U2.5 U3.1 U4.4 U4.5 U4.6 U4.7 U4.8 | length 20.4
  Top Layer w0.254: SB2.2 v1(40.335,71.399) ; C6.1 v1(52.222,70.358) ; v1(55.22,52.045) 55.245,52.07 55.245,52.984 55.687,53.426 56.381,53.426 U1.99 ; v1(56.769,68.021) 56.769,66.751 56.967,66.553 U1.75 ; U1.51 73.716,66.553 73.914,66.751 C3.2 73.939,68.174 C2.2 73.914,70.383 v1(73.914,75.667)
USS_GND: C15.2 C16.1 C18.2 C19.1 C22.1 C23.2 JP1.2 JP1.3 SB2.1 U1.87 U1.89 | length 92
  Top Layer w0.254: JP1.2 JP1.3 2.261,69.317 1.702,69.875 1.702,72.593 3.15,74.041 23.52,74.041 24.816,72.746 39.446,72.746 ; C22.1 C23.2 39.446,72.746 ; v1(51.511,64.059) 49.606,64.059 49.149,64.516 49.149,66.04 C16.1 49.075,66.114 C15.2 40.82,66.114 40.335,66.599 SB2.1 40.299,68.758 38.837,68.758 38.151,69.444 38.151,71.45 39.446,72.746 ; U1.87 55.161,59.428 54.991,59.258 54.991,58.649 55.212,58.428 U1.89 58.53,58.428 59.487,59.385 59.487,62.967 58.458,63.995 57.798,63.995 v1(57.785,64.008)
  Bottom Layer w0.254: v1(51.511,64.059) 51.537,64.033 57.76,64.033 v1(57.785,64.008)
USSIN: C17.2 U1.97 Y2.1 | length 22.1
  Top Layer w0.254: Y2.1 47.075,48.124 47.447,47.752 47.447,46.787 ; C17.2 47.447,46.787 ; U1.97 55.088,54.428 47.447,46.787
USSOUT: R7.1 U1.98 | length 12.5
  Top Layer w0.254: R7.1 49.632,48.108 55.452,53.928 U1.98
USSXTAL_GND: C14.1 C17.1 SB1.1 U1.96 | length 61.5
  Top Layer w0.254: v1(43.663,40.869) 43.663,44.298 43.993,44.628 C14.1 ; v1(47.422,40.691) 47.422,42.342 C17.1 ; v1(47.432,38.811) 47.421,38.801 47.421,37.425 SB1.1 47.411,36.667 46.939,36.195 38.405,36.195 37.236,37.363 37.236,50.749 39.751,53.264 53.061,53.264 54.725,54.928 U1.96
  Bottom Layer w0.254: v1(43.663,40.869) 43.663,39.345 44.196,38.811 v1(47.432,38.811) 47.427,38.816 47.427,40.686 v1(47.422,40.691)
XTAL_GND: C1.1 C9.1 C13.1 C20.1 SB.1 U1.5 U1.8 U1.11 | length 67.7
  Top Layer w0.254: SB.1 56.109,42.113 58.318,39.903 60.757,39.903 ; C20.1 C13.1 v1(64.186,45.161) ; U1.8 61.508,52.415 61.091,52.832 ; v1(62.636,39.853) 62.586,39.903 60.757,39.903 ; U1.11 63.008,52.613 62.789,52.832 61.091,52.832 ; C9.1 67.64,41.3 67.818,41.123 v1(73.635,41.123) ; C1.1 72.111,44.755 v1(73.812,44.755) ; 60.757,39.903 58.191,42.469 58.191,47.041 58.903,47.752 58.903,48.717 60.008,49.823 U1.5 60.008,52.49 60.35,52.832 61.091,52.832
  Bottom Layer w0.254: v1(62.636,39.853) 63.424,39.853 65.278,41.707 65.278,44.679 64.859,45.098 64.249,45.098 v1(64.186,45.161) 64.198,45.174 64.198,45.834 65.176,46.812 72.898,46.812 73.838,45.872 73.838,44.78 v1(73.812,44.755) 74.625,44.755 74.93,44.45 74.93,41.504 74.549,41.123 v1(73.635,41.123)
pads on no net: U1.1 U1.2 U1.12 U1.22 U1.23 U1.24 U1.25 U1.28 U1.29 U1.71 U1.72 U1.73 U1.74 U1.77 U1.78 U1.79 U1.80 U1.81 U1.82 U1.83 U1.84 Y1.0 Y2.0

## Polygon pours and split planes (outlines as drawn)
TARGET_GND on Top Layer "TARGET_GND_L01_P000" (solid, remove dead copper, pour order 0): 0,89.992 99.974,89.992 99.974,0.051 99.924,0 0,0
TARGET_GND on Bottom Layer "TARGET_GND_L02_P001" (solid, remove dead copper, pour order 1): 0,89.992 100,89.992 100,0.025 99.974,0 0,0

## Keep-outs
Keep-Out Layer:
  the board outline again, w0.254

## Other copper
Top Layer:
  pour cut-out: 2.667,36.195 10.465,36.195 10.465,28.702 2.667,28.702

## Silkscreen, mask and mechanical layers (free items; w line width, h text height)
Top Overlay:
  lines w0.254: 10.033,12.7 10.033,15.799 20.193,15.799 20.193,12.7 ; 15.113,12.7 15.113,15.748 ; 20.65,12.7 20.65,15.799 30.81,15.799 30.81,12.7 ; 25.73,12.7 25.73,15.799
  text "MCU RESET" at 98.896,75.463 h1 r90
  text "MSP430FR6047" at 61.036,61.658 h1
  text "TX|RX|TEST|RST|GND|3.3" at 94.759,48.692 h1.52 r90
  text "COMM_SDA->" at 90.881,44.186 h0.8
  text "COMM_SCL->" at 90.957,41.392 h0.8
  text "COMM_IRQ->" at 91.084,38.902 h0.8
  text "GND" at 93.523,36.231 h1
  text "V-  V+" at 10.846,13.437 h1.52
  text "B-  A+" at 21.59,13.106 h1.52
  text "Prototype01 - 09/26" at 98.037,12.065 h1.52 r90
Bottom Overlay:
  text "CH1|GND|GND|CH0" at 1.617,74.447 h1.52 r90
  text "PG" at 1.633,57.861 h1.52 r90
  text "UP" at 64.465,16.833 h1.52
  text "SEL" at 62.636,12.388 h1.52
  text "RIGHT" at 52.56,12.065 h1.52 r90
  text "LEFT" at 66.802,12.014 h1.52 r90
  text "LED 2" at 43.917,4.724 h1.52
  text "LED 1" at 38.024,4.648 h1.52
  text "DOWN" at 66.751,0.526 h1.52

## Text inside footprints (layer, text, board x,y; h text height)
U2: Top Overlay "GND" at 88.374,14.347 h1.52 r180; Top Overlay "RX" at 88.374,11.847 h1.52 r180; Top Overlay "TX" at 88.574,9.347 h1.52 r180; Top Overlay "VCC" at 88.574,6.847 h1.52 r180; Top Overlay "Ground" at 62.074,15.247 h1.52 r180; Top Overlay "B-" at 56.174,10.347 h1.52 r180; Top Overlay "A+" at 56.074,5.447 h1.52 r180